# Altium PCB AD592BNZ.PcbDoc
Units mm, origin at the board's own origin, x right, y up, seen from the top; angles counter-clockwise.
Board outline 37 x 23 mm, 2 copper layers (Top Layer, Bottom Layer); 16 components, 11 nets, 66 pads, 43 vias.
Unrouted connection lines stored in the file: 14.
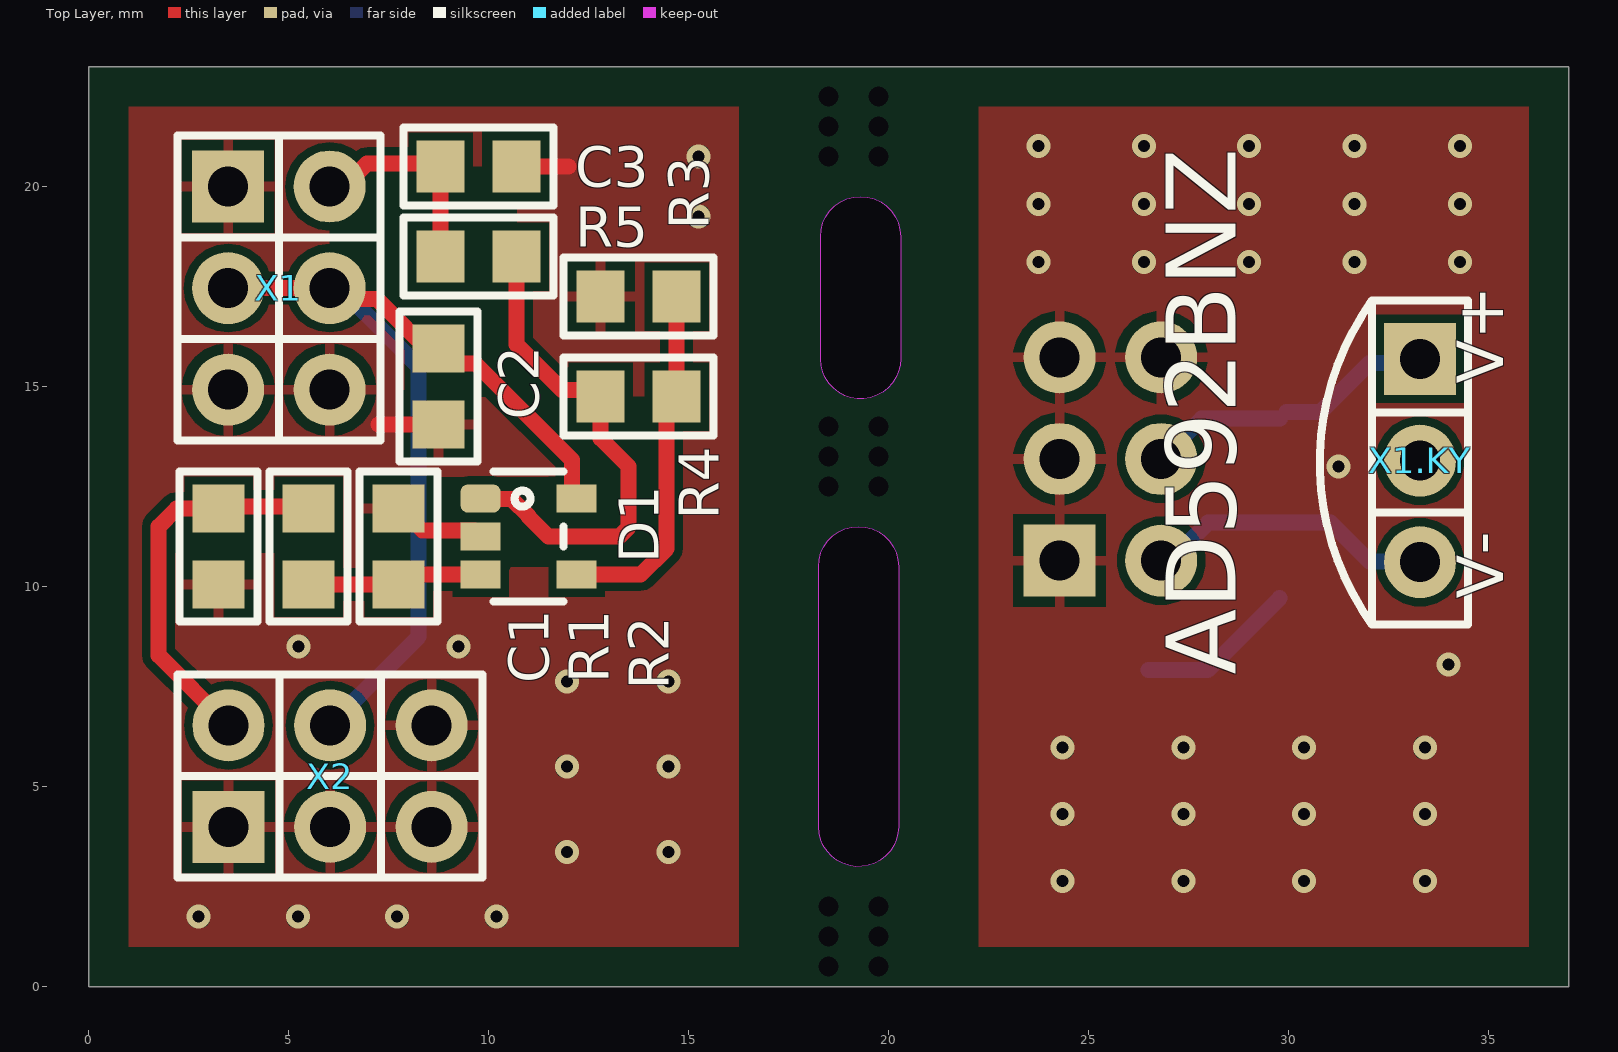
[diagram p0: Top Layer view]
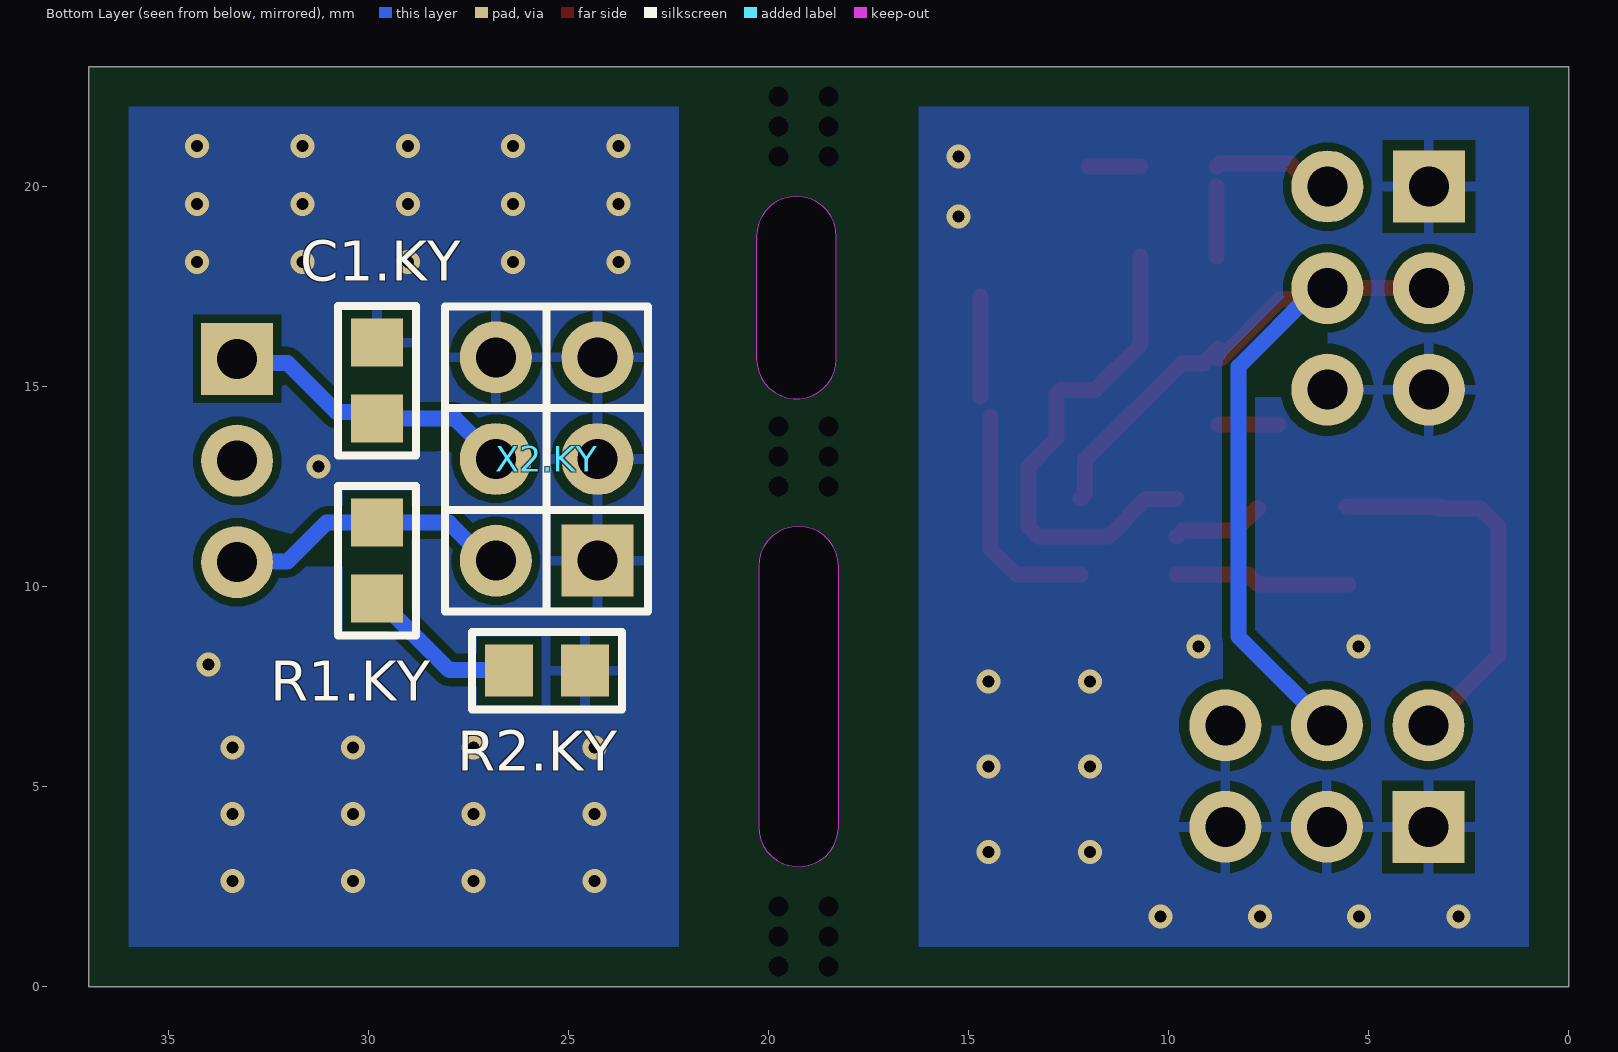
[diagram p1: Bottom Layer view, seen from below]
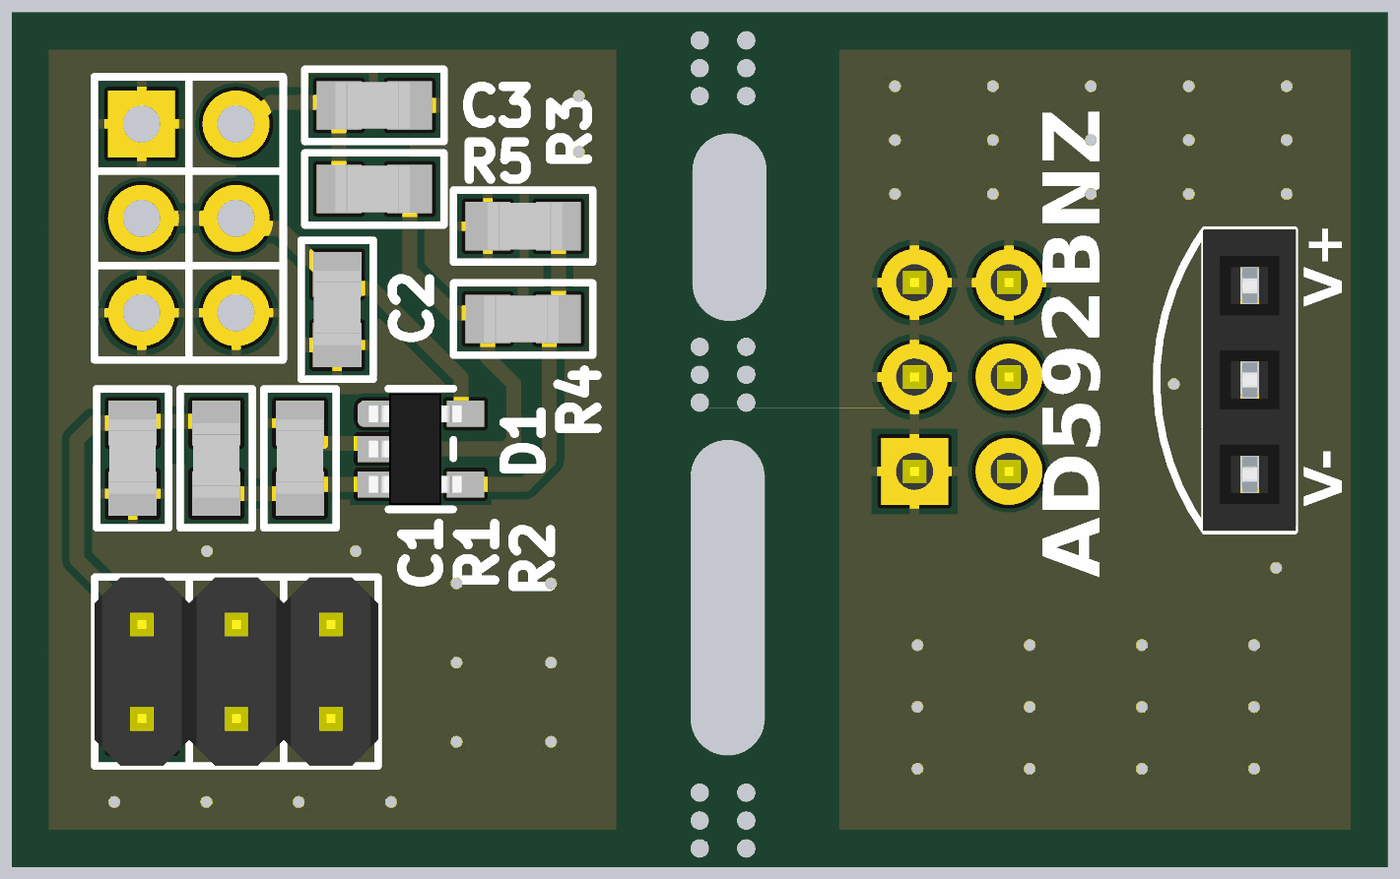
[diagram p2: 3D render of the assembled board from above, using the file's embedded part models]
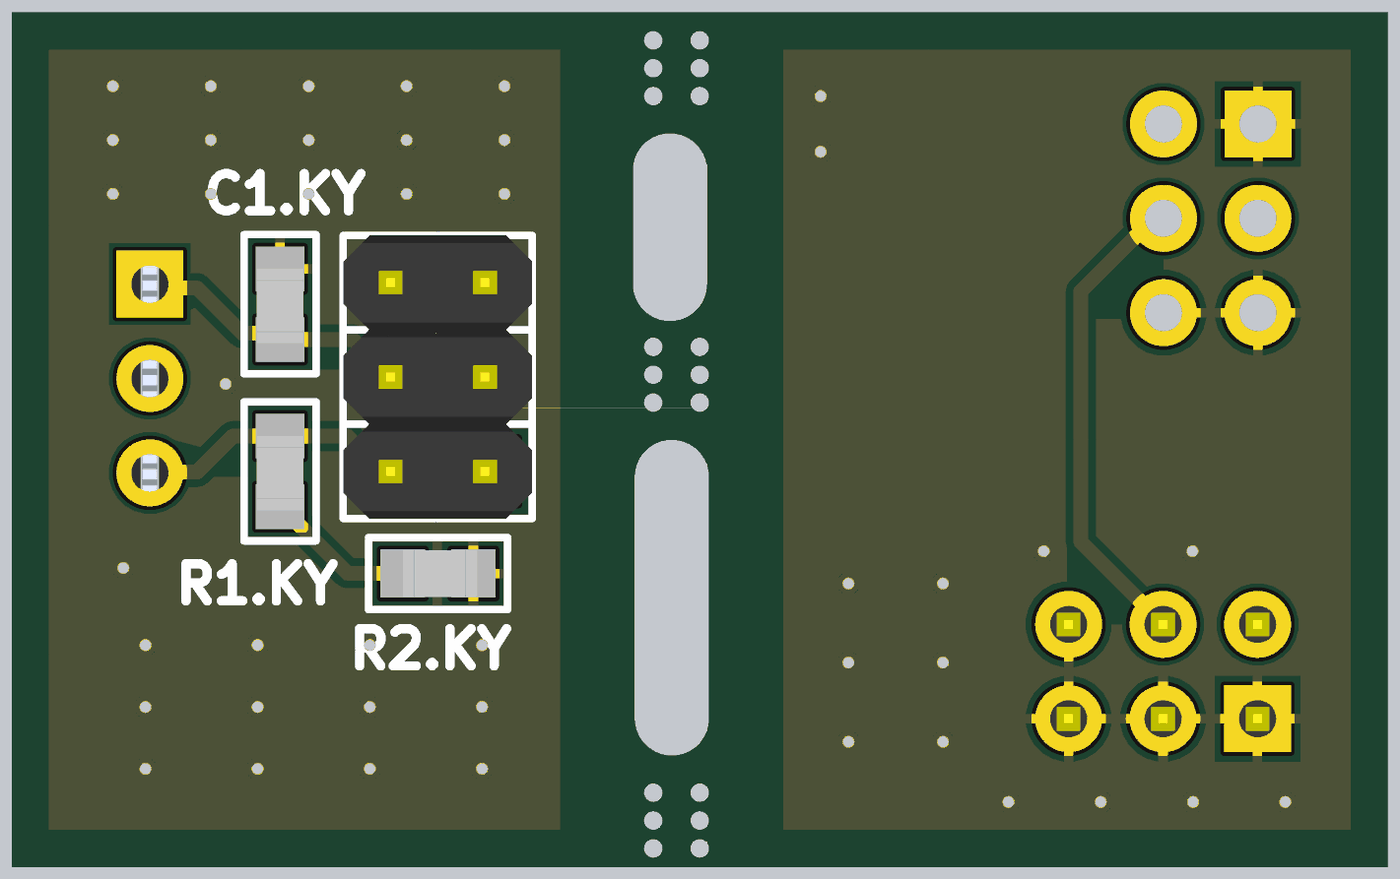
[diagram p3: 3D render of the assembled board from below, using the file's embedded part models]

## Layer stack, top to bottom
Top Solder: solder mask 0.0102, Solder Resist, Dk 3.5
Top Layer: signal copper 0.0356
Dielectric 1: dielectric 0.32, FR-4, Dk 4.8
Bottom Layer: signal copper 0.0356
Bottom Solder: solder mask 0.0102, Solder Resist, Dk 3.5

## Board outline
0,0 37,0 37,23 0,23
cut-out: 20.301,15.695 cw(c19.301,15.692) 18.301,15.689 18.301,18.75 cw(c19.301,18.75) 20.301,18.75
cut-out: 20.25,4 cw(c19.25,3.997) 18.25,3.994 18.25,10.5 cw(c19.25,10.5) 20.25,10.5

## Design rules (kind name [scope] priority, off if disabled: settings)
Clearance [All] p1: gap=0.2 ignorepadtopadclearanceinfootprint=FALSE
ComponentClearance [All] p1: gap=0 collisioncheckmode=3 verticalgap=0 showdistances=FALSE
HoleToHoleClearance [All] p1: gap=0.2 allowstackedmicrovias=TRUE
MinimumSolderMaskSliver [All] p1: minsoldermaskwidth=0
PolygonConnect [All vs InNet('GND')  And  InComponentClass('All Components')   Or     InNet('GND_KY')  And  InComponentClass('All Components')] p1: connectstyle=Relief reliefconductorwidth=0.254 reliefentries=4 polygonreliefangle="90 Angle" airgapwidth=0.254
RoutingVias [All] p1: holewidth=0.4 width=0.8 viastyle="Through Hole" minholewidth=0.3 minwidth=0.6 maxholewidth=1.5 maxwidth=3
SilkToSilkClearance [All] p1: silktosilkclearance=0
SilkToSolderMaskClearance [IsPad] p1: minsilkscreentomaskgap=0 clearancetoexposedcopper=TRUE
SolderMaskExpansion [All] p1: expansion=0.102 istentingtop=FALSE
Width [All] p1: maxlimit=0.6 minlimit=0.3 preferedwidth=0.4
25 further rules are at their usual default settings.

## Components (designator, comment, footprint, x,y, rotation, side; value= is the part's Value field where it differs from the comment)
C1 "C0805" 0805 3.25,11 r270 top value=10nF
C1.KY "C0805" 0805 29.787,15.148 r90 bottom value=10uF
C2 "C0805" 0805 8.75,15 r270 top value=10uF
C3 "C0805" 0805 9.75,20.5 r0 top value=10nF
D1 "AD8628" SOT-23-5 11,11.25 r90 top
R1 "R0805 Yageo" 0805 5.5,11 r90 top value=10k
R1.KY "R0805 Yageo" 0805 29.787,10.648 r90 bottom value=100
R2 "R0805 Yageo" 0805 7.75,11 r270 top value=100k
R2.KY "R0805 Yageo" 0805 25.537,7.898 r0 bottom value=950
R3 "R0805 Yageo" 0805 13.75,17.25 r180 top value=10k
R4 "R0805 Yageo" 0805 13.75,14.75 r0 top value=100k
R5 "R0805 Yageo" 0805 9.75,18.25 r0 top value=100
X1 "PLD6-2,54" PLD6-2,54 3.5,20 r270 top
X1.KY "AD592BNZ" AD592 33.287,13.148 r90 top
X2 "PLD6-2,54" PLD6-2,54 3.5,4 r0 top
X2.KY "PLD6-2,54" PLD6-2,54 24.287,10.648 r90 bottom

## Footprints (in the part's own frame and the unit in brackets; to place one, negate y for a bottom-side part, rotate by r counter-clockwise, add the part's x,y. Pads: shape width x height; smd on the part's side, far side on the other; paste and mask are expansions set on the pad)
0805 [mm]
  rect 1.2x1.3 smd: 1(-0.95,0) 2(0.95,0)
  silkscreen extent -1.87,-0.97 1.87,0.97, body extent -1.05,-0.63 0.95,0.63, height 0.55
AD592 [mm]
  rect 1.8x1.8 hole 1: 1(2.54,0)
  round 1.8 hole 1: 2(0,0) 3(-2.54,0)
  silkscreen extent -4.1,-1.2 4,2.5, body extent -4.1,-1.25 4.02,1.25, height 8.5
PLD6-2,54 [mm]
  rect 1.8x1.8 hole 1: 1(0,-0.01)
  round 1.8 hole 1: 2(0,2.53) 3(2.54,-0.01) 4(2.54,2.53) 5(5.08,-0.01) 6(5.08,2.53)
  silkscreen extent -1.27,-1.28 6.35,3.8
SOT-23-5 [mm]
  rrect50% 0.7x1 smd: 1(0.95,1.2)
  rect 0.7x1 smd: 2(0,1.2) 3(-0.95,1.2) 4(-0.95,-1.2) 5(0.95,-1.2)
  silkscreen extent -1.62,-0.88 1.62,0.88, body extent -1.5,-1.1 1.5,1.4, height 1.05

## Part data
C1 C1.KY C2 C3: ComponentHeigt=1.3, Firme=AVX, KIND=Конденсатор, Leadform=SMD, Packaging=0805
R1 R1.KY R2 R2.KY R3 R4 R5: ComponentHeigt=0.6, Firme=Yageo, KIND=Резистор, Leadform=SMD, Packaging=0805
X1 X2 X2.KY: ComponentHeigt=5.5, Name=Вилка, Specification="Вилка PLD2-2 *", Typ=PLD2-2

## Free pads (board coordinates)
  round 0 hole 0.5 unplated: 38(19.75,0.5) 38(19.75,12.5) 38(19.75,20.75) 39(19.75,1.25) 39(19.75,2) 39(19.75,13.25) 39(19.75,14) 39(19.75,21.5) 39(19.75,22.25) 41(18.5,20.75) 41(18.5,0.5) 41(18.5,12.5) 42(18.5,21.5) 42(18.5,1.25) 42(18.5,2) 42(18.5,13.25) 42(18.5,14) 42(18.5,22.25)

## Via types
v1: diameter 0.6, hole 0.3, Top Layer to Bottom Layer, tented both sides, 43 vias

## Nets (pads, with @x,y where several pads share a name; then routed paths per layer and width w, separated by ;. In a path a pad name is that pad's centre, name@x,y a point inside that pad or via, vN(x,y) a via of type N, cw(c..) or ccw(c..) an arc to the next point about the centre after c; other vN are vias at no path point)
5V_KY: C1.KY.1 X1.KY.1 X2.KY.4 | length 7.3
  Bottom Layer w0.4: X2.KY.4 27.827,14.198 C1.KY.1 ; C1.KY.1@29.952,14.364 30.802,14.364 32.021,15.583 33.181,15.583 X1.KY.1
+5V: C2.1 D1.5 X1.3 X1.4 X2.4 | length 24.4
  Top Layer w0.4: X1.3 X1.4 6.298,17.192 7.208,17.192 8.7,15.7 C2.1@8.75,15.7 ; C2.1 9.124,15.576 9.674,15.576 12.084,13.166 12.084,12.316 D1.5
  Bottom Layer w0.4: X1.4 6.29,17.46 8.25,15.5 8.25,8.75 X2.4@6.035,6.535
GND: C1.2 C2.2 C3.2 D1.2 R2.1 R3.2 X1.1 X1.5 X1.6 X2.1 X2.3 X2.5 X2.6 | length 5.2
  Top Layer w0.4: X1.6 X1.6@6.08,14.92 ; 7.25,14.05 C2.2 ; R2.1 7.8,11.95 8.35,11.4 9.65,11.4 D1.2 ; C3.2 12,20.5
  other v1: 2.753,1.75 5.235,1.75 7.716,1.75 10.198,1.75 11.958,3.369 14.5,3.369 11.958,5.5 14.5,5.5 11.958,7.631 14.5,7.631 5.25,8.5 9.25,8.5 15.25,19.25 15.25,20.75
GND_KY: C1.KY.2 R2.KY.1 X2.KY.1 X2.KY.3 X2.KY.5 X2.KY.6
  other v1: 24.355,2.643 27.372,2.643 30.389,2.643 33.407,2.643 24.355,4.307 27.372,4.307 30.389,4.307 33.407,4.307 24.355,5.972 27.372,5.972 30.389,5.972 33.407,5.972 34,8.05 31.25,13 23.75,18.117 26.383,18.117 29.017,18.117 31.65,18.117 34.283,18.117 23.75,19.567 26.383,19.567 29.017,19.567 31.65,19.567 34.283,19.567 23.75,21.016 26.383,21.016 29.017,21.016 31.65,21.016 34.283,21.016
NetD1_1: D1.1 R4.1 R5.2 | length 12.6
  Top Layer w0.4: D1.1 9.815,12.185 10.581,12.185 11,11.766 11,11.75 11.5,11.25 13.266,11.25 13.5,11.484 13.5,13 12.8,13.7 12.8,14.8 12.684,14.916 11.834,14.916 10.7,16.05 R5.2
NetD1_3: D1.3 R1.1 R2.2 | length 4.4
  Top Layer w0.4: R1.1 R2.2 8,10.3 D1.3
NetD1_4: D1.4 R3.1 R4.2 | length 8.3
  Top Layer w0.4: D1.4 13.8,10.3 14.45,10.95 R4.2@14.45,14.25 ; R4.2 14.7,16.5 R3.1
NetR1.KY_1: R1.KY.1 R2.KY.2 | length 4
  Bottom Layer w0.4: R2.KY.2@26.497,7.909 27.977,7.909 R1.KY.1@29.777,9.709
V-_KY: R1.KY.2 X1.KY.3 X2.KY.2 | length 7
  Bottom Layer w0.4: X2.KY.2@27.038,10.648 27.988,11.598 R1.KY.2 31.052,11.598 32.021,10.629 X1.KY.3@33.287,10.629
VOUT: C3.1 R5.1 X1.2 | length 4.8
  Top Layer w0.4: X1.2 6.384,20 6.964,20.58 8.72,20.58 C3.1 ; R5.1 C3.1@8.8,20
VOUT_KY: C1.1 R1.2 X2.2 | length 9.7
  Top Layer w0.4: C1.1@3.2,12 R1.2@5.55,12 ; C1.1 2.2,11.95 1.75,11.5 1.75,8.28 X2.2
pads on no net: X1.KY.2

## Polygon pours and split planes (outlines as drawn)
GND on Top Layer "NONET_L-01_P-001" (solid, remove dead copper, pour order 0): 1,22 1,1 16.25,1 16.25,22
GND_KY on Top Layer "NONET_L-01_P-001" (solid, remove dead copper, pour order 2): 22.25,22 22.25,1 36,1 36,22
GND on Bottom Layer "NONET_L-01_P-001" (solid, remove dead copper, pour order 1): 1,22 1,1 16.25,1 16.25,22
GND_KY on Bottom Layer "NONET_L-01_P-001" (solid, remove dead copper, pour order 3): 22.25,22 22.25,1 36,1 36,22

## Other copper
Top Layer:
  pour cut-out: 2.158,11.331 2.158,10.85 6.35,10.85 6.35,11.15
  pour cut-out: 6.846,11.096 6.846,10.5 8.75,10.5
  pour cut-out: 7.9,15.15 7.9,14.75 10,14.75
  pour cut-out: 7.9,15.15 9.75,15.15 9.75,14.75
  pour cut-out: 7.685,12.728 12.25,12.728 12.25,11.75
  pour cut-out: 8.623,12.946 8.623,10.3 9.8,10.3
  pour cut-out: 10.554,11.469 10.554,10.5 11.75,10.5
  pour cut-out: 6.03,20 6.03,17.15 10.7,17.15
  pour cut-out: 8.8,20.5 10.7,20.5 10.7,18.25
  pour cut-out: 10.7,20.5 10.7,18.25 8.8,18.25
  pour cut-out: 8.8,18.25 8.8,15.483 11.267,15.483
  pour cut-out: 12.8,14.75 14.858,14.75 14.858,13.9
Bottom Layer:
  pour cut-out: 28.937,11.191 28.937,10.25 30.5,10.25
  pour cut-out: 30.691,16.225 30.691,14.5 29.5,14.5
  pour cut-out: 28.883,15.971 28.883,13.387 30.802,13.387
  pour cut-out: 27.902,13.387 30.802,13.387 30.802,14.364
  pour cut-out: 28.937,10.504 33.432,10.504 33.432,11.708
  pour cut-out: 6.04,6.53 8.627,6.53 8.627,8.594
  pour cut-out: 6.03,17.46 6.03,14.75 8.25,14.75

## Silkscreen, mask and mechanical layers (free items; w line width, h text height)
Top Overlay:
  text "AD592BNZ" at 29.25,7.79 h3 r90
Board 2:
  lines w0.2: 18.25,3.994 18.253,10.5 ; 18.25,4 ccw(c19.25,4) 20.25,4 ; 18.25,10.514 cw(c19.25,10.514) 20.25,10.5 20.251,4 ; 18.301,15.689 18.304,18.75 ; 18.301,15.695 ccw(c19.301,15.695) 20.301,15.695 20.301,18.75 ccw(c19.301,18.764) 18.301,18.764 ; 0,0 0,23 17.25,23 21,23 37,23 37,0 21,0 17.25,0 0,0

## Dimensions
37,0 to 37,23 on Dimension
0,0 to 37,0 on Dimension

## Text inside footprints (layer, text, board x,y; h text height)
X1.KY: Top Overlay "V-" at 35.762,9.7 h2 r90; Top Overlay "V+" at 35.762,15.075 h2 r90